# Altium PCB FOC.PcbDoc (part 2 of 2)
Units mil, origin at the board's own origin, x right, y up, seen from the top; angles counter-clockwise.
Board outline 3937.01 x 3149.61 mil, 4 copper layers (Top Layer, GND, signal layer 3, Bottom Layer), stack 23.756 mil thick; 133 components, 165 nets, 424 pads, 310 vias.
Unrouted connection lines stored in the file: 26.
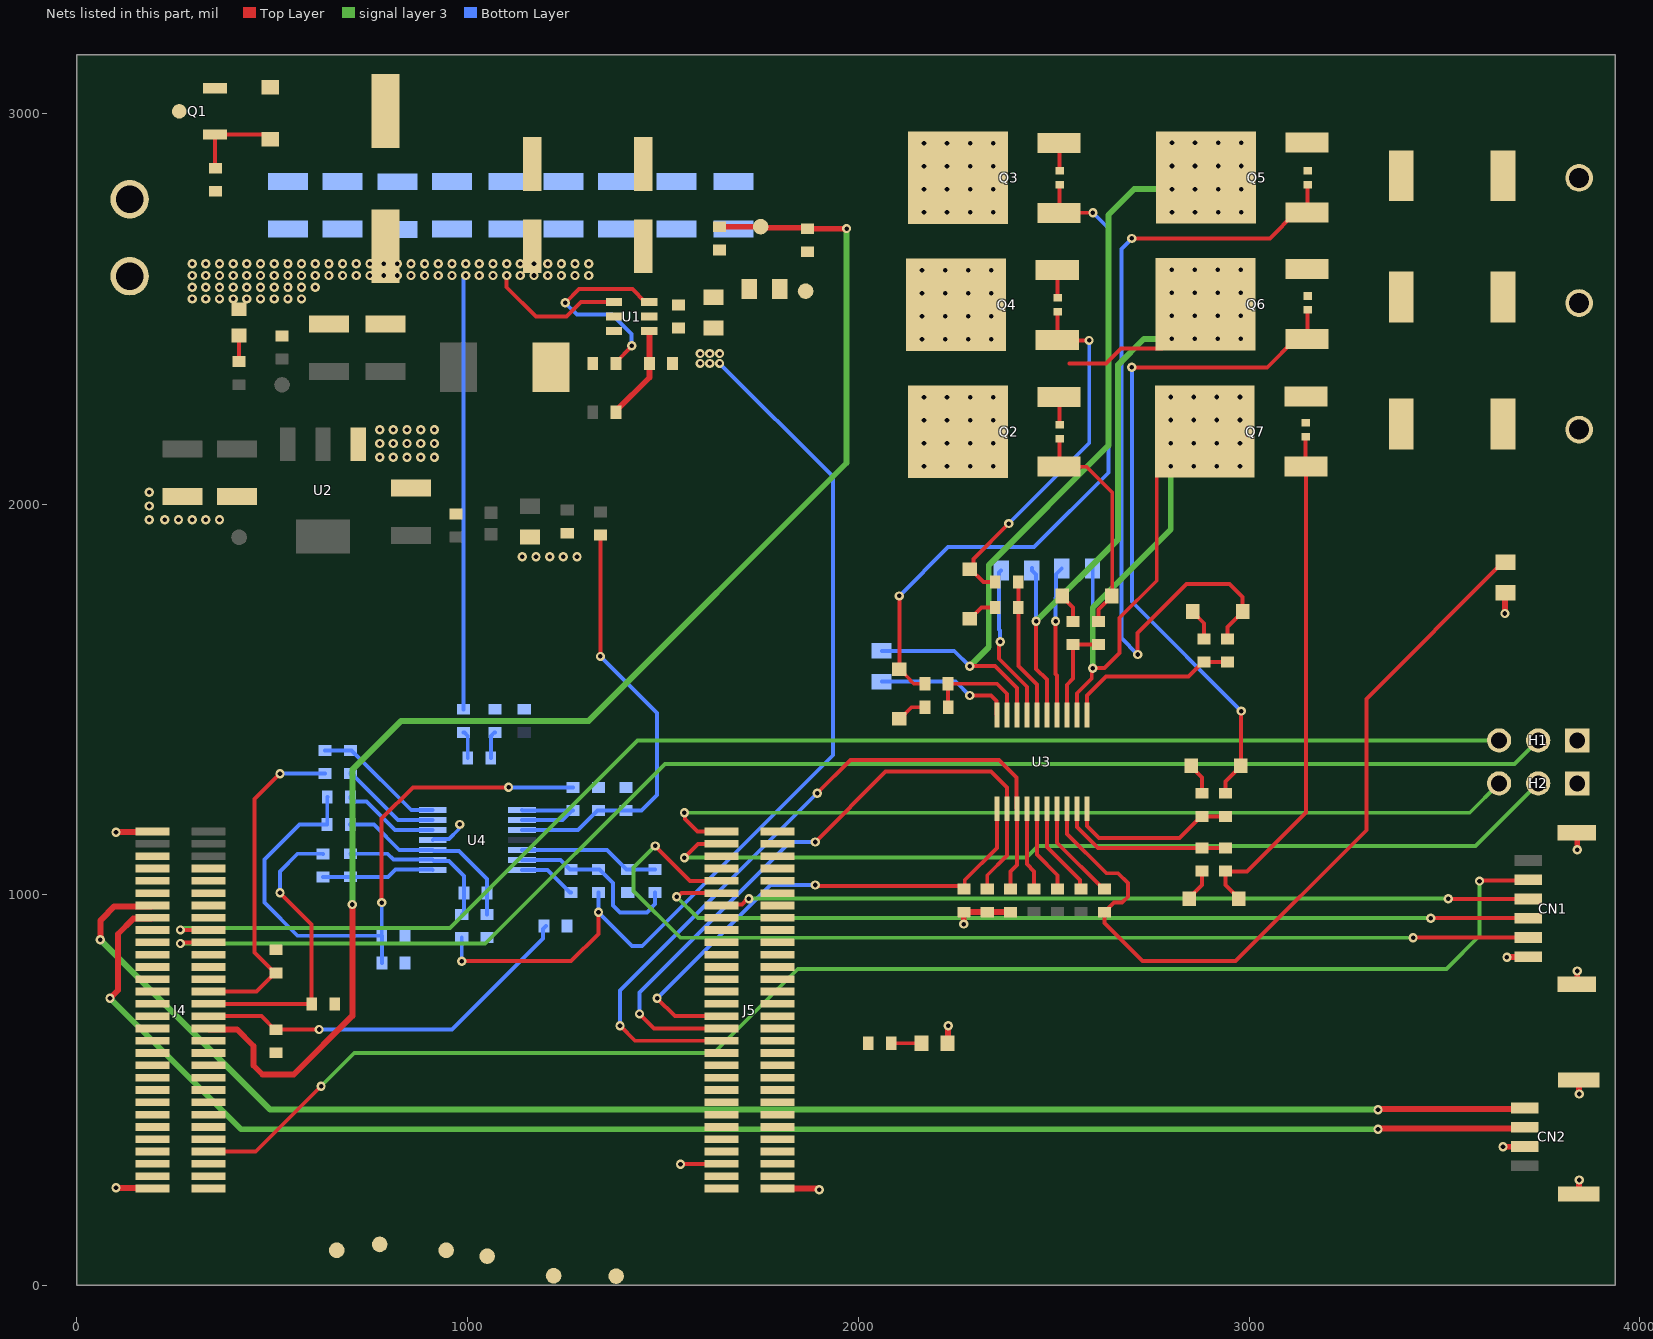
[diagram p4: the nets of this part, all layers, seen from the top]

## Via types
v1: diameter 23.62, hole 11.81, Top Layer to Bottom Layer, 310 vias

## Nets (pads, with @x,y where several pads share a name; then routed paths per layer and width w, separated by ;. In a path a pad name is that pad's centre, name@x,y a point inside that pad or via, vN(x,y) a via of type N, cw(c..) or ccw(c..) an arc to the next point about the centre after c; other vN are vias at no path point) (continued)
+12V: C1.1 C3.1 C4.1 C6.1 C7.1 C8.1 C18.1 C19.1 C20.1 C21.1 C22.1 C23.1 C24.1 C25.1 C26.1 C33.1 D1.1 Q1.3 Q2.2 Q3.2 Q4.2 R1.2 TP1.1 U1.3 U1.5 U3.7 | length 257.6
  Top Layer w10: U3.7@2508.39,1220 2508.39,1133.19 2627.05,1014.53 C33.1@2630,1014.53
  other v1: 2168.06,2096.42 2227.12,2096.42 2227.12,2096.42 2286.17,2096.42 2345.23,2096.42 2168.06,2155.47 2227.12,2155.47 2286.17,2155.47 2345.23,2155.47 2168.06,2214.53 2227.12,2214.53 2286.17,2214.53 2345.23,2214.53 2345.23,2214.53 2168.06,2273.58 2227.12,2273.58 2286.17,2273.58 2345.23,2273.58 2163.06,2421.42 2222.12,2421.42 2222.12,2421.42 2281.17,2421.42 2340.23,2421.42 2163.06,2480.47 2222.12,2480.47 2281.17,2480.47 2340.23,2480.47 2163.06,2539.53 2222.12,2539.53 2281.17,2539.53 2340.23,2539.53 2340.23,2539.53 2163.06,2598.58 2222.12,2598.58 2281.17,2598.58 2340.23,2598.58 2168.06,2746.42 2227.12,2746.42 2227.12,2746.42 2286.17,2746.42 2345.23,2746.42 2168.06,2805.47 2227.12,2805.47 2286.17,2805.47 2345.23,2805.47 2168.06,2864.53 2227.12,2864.53 2286.17,2864.53 2345.23,2864.53 2345.23,2864.53 2168.06,2923.58 2227.12,2923.58 2286.17,2923.58 2345.23,2923.58
GND: C12.2 C13.2 C14.2 C15.2 C16.2 C17.2 C34.2 C35.1 C36.1 C37.2 C38.1 C39.1 CN1.1 CN1.7 CN1.8 CN2.2 CN2.5 CN2.6 H1.1 H2.1 J4.1 J4.30 J5.31 LED2.2 R7.1 R36.2 R37.2 R38.2 R47.1 U2.1 U4.11 | length 899.8
  Top Layer w15: v1(100,250) 100.85,249.15 192.45,249.15 J4.30@193.3,248.3 ; v1(100,1160) 100.85,1160.85 192.45,1160.85 J4.1@193.3,1161.7 ; J5.31@1793.3,248.3 1894.37,248.3 1897.67,245 v1(1900,245) ; LED2.2@2228.47,620 2229.23,620.77 2229.23,664.23 v1(2230,665) ; v1(2270,925) R38.2@2270,955.47 R37.2@2330,955.47 R36.2@2390,955.47 ; v1(3650,355) 3650.2,355.2 3705.9,355.2 CN2.2@3706.1,355.4 ; v1(3655,1720) 3655,1771.61 R7.1@3656.01,1772.62 ; v1(3660,840) 3660.75,840.75 3714.25,840.75 CN1.1@3715,841.5 ; CN1.8@3839,770.7 3840,771.7 v1(3840,805) ; CN1.7@3839,1158.5 3840,1157.5 v1(3840,1115) ; CN2.6@3843.9,234.2 3845,235.3 v1(3845,270) ; CN2.5@3843.9,525.9 3845,524.8 v1(3845,490)
  Bottom Layer w10: U4.11@910.83,1140 913.55,1142.72 952.48,1142.72 977.39,1167.63 977.39,1177.39 v1(980,1180)
  other v1: 1140,1865 1175,1865 1210,1865 1245,1865 1280,1865 185,1960 225,1960 260,1960 295,1960 330,1960 365,1960 185,1995 185,2030 775,2120 810,2120 845,2120 880,2120 915,2120 775,2155 810,2155 845,2155 880,2155 915,2155 775,2190 810,2190 845,2190 880,2190 915,2190
IIC_SCL: CN2.3 J4.8 | length 4040.6
  Top Layer w15: v1(84.65,735.35) 105,755.7 105,899.7 144.15,938.85 190.95,938.85 J4.8@193.3,941.2 ; v1(3330,400) 3331.65,401.65 3703.05,401.65 CN2.3@3706.1,404.7
  signal layer 3 w15: v1(84.65,735.35) 420,400 v1(3330,400)
IIC_SDA: CN2.4 J4.7 | length 4026.8
  Top Layer w15: v1(60,885) 60,933.8 80,953.8 80,955 95.35,970.35 190.95,970.35 J4.7@193.3,972.7 ; v1(3330,450) 3331.65,451.65 3703.85,451.65 CN2.4@3706.1,453.9
  signal layer 3 w15: v1(60,885) 495,450 v1(3330,450)
MCU_ADC_IU: C36.2 J4.45 R45.2 | length 1002.6
  Top Layer w10: J4.45@336.6,689.2 472.37,689.2 507.05,654.53 C36.2@510,654.53 510.24,654.76 619.76,654.76 v1(620,655)
  Bottom Layer w10: v1(620,655) 960,655 1193.27,888.27 1193.27,912.8 R45.2@1200.47,920
MCU_ADC_IV: C38.2 J4.46 R50.2 | length 767
  Top Layer w10: J4.46@336.6,720.7 600.24,720.7 C38.2@600.94,720 600.94,924.06 v1(520,1005)
  Bottom Layer w10: v1(520,1005) 520,1060 565,1105 629.53,1105 R50.2@630,1104.53
MCU_ADC_IW: C39.2 J4.47 R51.2 | length 866.9
  Top Layer w10: J4.47@336.6,752.2 459.25,752.2 C39.2@507.05,800 ; C39.2@510,800 C39.2@507.05,800 ; v1(520,1310) 455,1245 455,852.05 C39.2@507.05,800
  Bottom Layer w10: v1(520,1310) 520.24,1310.24 634.76,1310.24 R51.2@635,1310.47
MCU_PWM_UH: J5.16 R38.1 TP5.1 U3.1 | length 1334
  Top Layer w10: v1(1485,735) 1530.7,689.3 J5.16@1650,689.3 ; v1(1890,1025) 1892.61,1022.39 2262.13,1022.39 R38.1@2270,1014.53 2272.45,1016.98 2272.45,1037.45 2354.84,1119.84 U3.1@2354.84,1220
  Bottom Layer w10: v1(1485,735) 1775,1025 v1(1890,1025)
MCU_PWM_UL: J5.30 R39.2 TP8.1 U3.4 | length 213.1
  Top Layer w10: U3.4@2431.61,1220 2431.61,1078.39 2450,1060 R39.2@2450,1014.53
MCU_PWM_VH: J5.17 R37.1 TP6.1 U3.2 | length 1752.5
  Top Layer w10: v1(1440,695) 1477.2,657.8 J5.17@1650,657.8 ; v1(1890,1135) 2070,1315 2340,1315 2380.43,1274.57 U3.2@2380.43,1220 2380.43,1100.43 2330,1050 R37.1@2330,1014.53
  Bottom Layer w10: v1(1440,695) 1440,750 1825,1135 v1(1890,1135)
MCU_PWM_VL: J5.29 R40.2 TP9.1 U3.5 | length 227.3
  Top Layer w10: U3.5@2457.2,1220 2457.2,1102.8 2510,1050 R40.2@2510,1014.53
MCU_PWM_WH: J5.18 R36.1 TP7.1 U3.3 | length 1936.6
  Top Layer w10: v1(1390,665) 1428.7,626.3 J5.18@1650,626.3 ; v1(1895,1260) 1980,1345 2360,1345 2405.02,1299.98 2405.02,1221 U3.3@2406.02,1220 2406.02,1076.02 2390,1060 R36.1@2390,1014.53
  Bottom Layer w10: v1(1390,665) 1390,755 v1(1895,1260)
MCU_PWM_WL: J5.28 R41.2 TP10.1 U3.6 | length 347.1
  Top Layer w10: v1(1545,310) 1545.65,310.65 1649.35,310.65 J5.28@1650,311.3 ; U3.6@2482.8,1220 2482.8,1122.2 2567.55,1037.45 2567.55,1016.98 R41.2@2570,1014.53
NetC5_1: C5.1 U1.6 | length 538.1
  Top Layer w10: v1(1250,2515) 1285,2550 1421.95,2550 1454.55,2517.4 U1.6@1465.2,2517.4 ; C5.1@1379.53,2360 1379.53,2362.95 1420,2403.43 v1(1420,2405)
  Bottom Layer w10: v1(1250,2515) 1280,2485 1370,2485 1420,2435 v1(1420,2405)
NetC5_2: C5.2 L1.1 U1.2
NetC27_1: C27.1 R33.1 R42.1 U4.6 | length 468.2
  Bottom Layer w10: U4.6@1139.17,1088.82 1237.75,1088.82 1262.05,1064.53 R42.1@1265,1064.53 R33.1@1335,1064.53 1337.95,1064.53 1372.02,1030.47 1372.02,972.99 1390,955 1459.14,955 1480,975.86 C27.1@1480,1005.47
NetC27_2: C27.2 R27.1 R46.2 U4.5 | length 361.5
  Bottom Layer w10: U4.5@1139.17,1114.41 1357.16,1114.41 1407.05,1064.53 R27.1@1410,1064.53 C27.2@1480,1064.53
NetC28_1: C28.1 R34.1 R48.1 U4.9 | length 414.9
  Bottom Layer w10: R48.1@700,1105 795,1105 810,1090 909.65,1090 U4.9@910.83,1088.82 913.55,1086.1 952.48,1086.1 990.47,1048.11 C28.1@990.47,1005 990.47,955 R34.1@985,949.53
NetC28_2: C28.2 R28.1 R52.2 U4.10 | length 498.9
  Bottom Layer w10: R52.2@699.53,1180 760,1180 825,1115 910.24,1115 913.55,1111.69 978.31,1111.69 1030,1060 1049.53,1040.47 C28.2@1049.53,1005 1049.53,950 R28.1@1050,949.53
NetC29_1: C29.1 R29.1 R53.2 U4.12 | length 318.3
  Bottom Layer w10: R53.2@700,1250 700,1247.05 708.78,1238.27 741.73,1238.27 814.41,1165.59 U4.12@910.83,1165.59 ; C29.1@1059.53,1350 1059.53,1406.69 1068.31,1415.47 R29.1@1070,1415.47
NetC29_2: C29.2 R35.1 R49.1 U4.13 | length 331
  Bottom Layer w10: R49.1@700,1310.47 702.95,1310.47 822.25,1191.18 U4.13@910.83,1191.18 ; R35.1@990,1415.47 991.69,1415.47 1000.47,1406.69 C29.2@1000.47,1350
NetC30_1: C30.1 U3.20 | length 350.9
  Top Layer w10: v1(2285,1510) 2340,1510 2353.84,1496.16 2353.84,1461 U3.20@2354.84,1460
  Bottom Layer w10: C30.1@2060,1545.63 2249.37,1545.63 v1(2285,1510)
NetC31_1: C31.1 U3.17 | length 404.5
  Top Layer w10: v1(2363.02,1647.5) 2360.41,1644.89 2360.41,1621.21 2360,1620.79 2360,1604.05 2431.61,1532.44 U3.17@2431.61,1460
  Bottom Layer w10: v1(2363.02,1647.5) 2363.02,1676.29 2360,1679.31 2360,1824.37 C31.1@2365.63,1830
NetC32_1: C32.1 U3.14 | length 382.9
  Top Layer w10: v1(2505,1700) 2505,1565 2508.38,1561.62 U3.14@2508.38,1460
  Bottom Layer w10: v1(2505,1700) 2505,1759.88 2505.94,1760.82 2505.94,1820.31 C32.1@2520.63,1835
NetC37_1: C37.1 R43.1 R47.2 U4.3 | length 1108.4
  Top Layer w10: v1(1340,1610) R43.1@1340,1920.47
  Bottom Layer w10: U4.3@1139.17,1165.59 1282.16,1165.59 1332.05,1215.47 C37.1@1335,1215.47 R47.2@1405,1215.47 1445.47,1215.47 1485,1255 1485,1465 v1(1340,1610)
NetCON1_2: CON1.2 Q1.2
NetD1_2: D1.2 Q1.1 R2.2 | length 233.9
  Top Layer w10: R2.2@355,2859.53 353.4,2861.13 Q1.1@353.4,2945.9 482.4,2945.9 D1.2@495,2933.3
NetD2_1: D2.1 Q2.1 R12.2 R15.2 | length 580
  Top Layer w10: R15.2@2515,2167.28 2515,2096.3 Q2.1@2514.2,2095.5 2584.5,2095.5 2650,2030 2650,1765 2615,1730 R12.2@2615,1699.53
NetD2_2: D2.2 R9.2 | length 77.2
  Top Layer w10: D2.2@2521.6,1765 2521.6,1763.4 2550,1735 R9.2@2550,1699.53
NetD3_1: D3.1 Q3.1 R13.2 R16.2 | length 1775.6
  Top Layer w10: v1(2105,1765) D3.1@2105,1576.8 2106.6,1576.8 2133.04,1550.36 2133.04,1548.76 2141.8,1540 R13.2@2170.47,1540 ; Q3.1@2514.2,2745.5 2515,2746.3 R16.2@2515,2817.28 ; Q3.1@2514.2,2745.5 v1(2600.47,2745.47)
  Bottom Layer w10: v1(2105,1765) 2230,1890 2450,1890 2640,2080 2640,2705.94 v1(2600.47,2745.47)
NetD3_2: D3.2 R10.2 | length 78.4
  Top Layer w10: D3.2@2105,1450 2106.6,1450 2136.6,1480 R10.2@2170.94,1480
NetD4_1: D4.1 Q4.1 R14.2 R17.2 | length 944.5
  Top Layer w10: D4.1@2285,1833.4 2294.84,1843.24 2294.84,1859.84 v1(2385,1950) ; D4.1@2286.6,1833.4 2320,1800 R14.2@2350.47,1800 ; R17.2@2510,2492.28 2510,2421.3 Q4.1@2509.2,2420.5 2510.82,2418.88 v1(2590.69,2418.88)
  Bottom Layer w10: v1(2385,1950) 2591.14,2156.14 2591.14,2418.43 v1(2590.69,2418.88)
NetD4_2: D4.2 R11.2 | length 77.2
  Top Layer w10: D4.2@2285,1706.6 2286.6,1706.6 2315,1735 R11.2@2350.47,1735
NetD5_1: D5.1 Q5.1 R21.2 R25.2 | length 2151.9
  Top Layer w10: v1(2700,2680) 3053.31,2680 3119.47,2746.16 Q5.1@3148.97,2746.16 ; v1(2715,1615) 2715,1670 2840,1795 2950,1795 2983.4,1761.6 D5.1@2983.4,1725 2983.4,1723.4 2945,1685 R21.2@2945,1654.53 ; Q5.1@3150,2747.19 R25.2@3150,2817.28
  Bottom Layer w10: v1(2700,2680) 2673.19,2653.19 2673.19,1656.81 v1(2715,1615)
NetD5_2: D5.2 R18.2 | length 82.2
  Top Layer w10: D5.2@2856.6,1725 2856.6,1723.4 2885,1695 R18.2@2885,1654.53
NetD6_1: D6.1 Q6.1 R22.2 R24.2 | length 1777.1
  Top Layer w10: v1(2700,2350) 3046.7,2350 3118.66,2421.96 Q6.1@3148.16,2421.96 3150,2423.8 R24.2@3150,2497.28 ; R22.2@2940,1259.53 2940,1290 2980,1330 v1(2980,1470)
  Bottom Layer w10: v1(2700,2350) 2700,1750 v1(2980,1470)
NetD6_2: D6.2 R19.2 | length 82.2
  Top Layer w10: D6.2@2851.6,1330 2851.6,1328.4 2880,1300 R19.2@2880,1259.53
NetD7_1: D7.1 Q7.1 R23.2 R26.2 | length 1314.7
  Top Layer w10: D7.1@2973.4,990 2973.4,991.6 2940,1025 R23.2@2940,1060.47 2940.47,1060 2995,1060 3145.91,1210.91 Q7.1@3145.91,2095.96 3145,2096.87 R26.2@3145,2172.28
NetD7_2: D7.2 R20.2 | length 84.3
  Top Layer w10: D7.2@2846.6,990 2846.6,991.6 2880,1025 R20.2@2880,1060.47
NetH1_2: H1.2 J4.51 | length 3763.4
  Top Layer w10: v1@265,875 268.2,878.2 J4.51@336.6,878.2
  signal layer 3 w10: v1(264.85,875.15) 1045.15,875.15 1505,1335 3680,1335 H1.2@3740,1395
NetH1_3: H1.3 J4.52 | length 3647.6
  Top Layer w10: v1(265,910) 265.15,909.85 336.45,909.85 J4.52@336.6,909.7
  signal layer 3 w10: v1(265,910) 270,915 955,915 1435,1395 H1.3@3640,1395
NetH2_2: H2.2 J5.2 | length 2373.3
  Top Layer w10: v1(1555,1095) 1590.2,1130.2 J5.2@1650,1130.2
  signal layer 3 w10: v1(1555,1095) 2430,1095 2460,1125 3580,1125 H2.2@3740,1285
NetH2_3: H2.3 J5.1 | length 2239.9
  Top Layer w10: v1(1555,1210) 1556.46,1208.54 1556.46,1193.54 1588.3,1161.7 J5.1@1650,1161.7
  signal layer 3 w10: v1(1555,1210) 3565,1210 H2.3@3640,1285
NetJ4_3: J4.3
NetJ4_4: J4.4
NetJ4_5: J4.5
NetJ4_6: J4.6
NetJ4_9: J4.9
NetJ4_10: J4.10
NetJ4_11: J4.11
NetJ4_12: J4.12
NetJ4_13: J4.13 R8.2
NetJ4_14: J4.14
NetJ4_15: J4.15
NetJ4_16: J4.16
NetJ4_17: J4.17
NetJ4_18: J4.18
NetJ4_19: J4.19
NetJ4_20: J4.20
NetJ4_21: J4.21
NetJ4_22: J4.22
NetJ4_23: J4.23
NetJ4_24: J4.24
NetJ4_25: J4.25
NetJ4_26: J4.26
NetJ4_27: J4.27
NetJ4_28: J4.28
NetJ4_29: J4.29
NetJ4_31: J4.31
NetJ4_32: J4.32
NetJ4_33: J4.33
NetJ4_35: J4.35
NetJ4_36: J4.36
NetJ4_37: J4.37
NetJ4_38: J4.38
NetJ4_39: J4.39
NetJ4_40: J4.40
NetJ4_41: J4.41
NetJ4_42: J4.42
NetJ4_43: J4.43
NetJ4_44: J4.44 R1.1 R3.2 TP2.1 | length 3656.4
  Top Layer w15: J4.44@336.6,657.8 338.95,655.45 409.55,655.45 452.27,612.73 452.27,562.73 475,540 555,540 705,690 v1(705,975) ; R3.2@1645,2709.53 1645.24,2709.76 1749.76,2709.76 TP2.1@1750,2710 1752.74,2707.26 1867.26,2707.26 R1.1@1870,2704.53 1969.53,2704.53 v1(1970,2705)
  signal layer 3 w15: v1(705,975) 705,1320 830,1445 1310,1445 1970,2105 v1(1970,2705)
NetJ4_48: J4.48
NetJ4_49: J4.49
NetJ4_50: J4.50
NetJ4_53: J4.53
NetJ4_54: J4.54
NetJ4_55: J4.55
NetJ4_56: J4.56
NetJ4_57: J4.57
NetJ5_3: J5.3
NetJ5_4: J5.4
NetJ5_8: J5.8
NetJ5_9: J5.9
NetJ5_10: J5.10
NetJ5_11: J5.11
NetJ5_12: J5.12
NetJ5_13: J5.13
NetJ5_14: J5.14
NetJ5_15: J5.15
NetJ5_19: J5.19
NetJ5_20: J5.20
NetJ5_21: J5.21
NetJ5_22: J5.22
NetJ5_23: J5.23
NetJ5_24: J5.24
NetJ5_25: J5.25
NetJ5_26: J5.26
NetJ5_27: J5.27
NetJ5_32: J5.32
NetJ5_33: J5.33
NetJ5_34: J5.34
NetJ5_35: J5.35
NetJ5_36: J5.36
NetJ5_37: J5.37
NetJ5_38: J5.38
NetJ5_39: J5.39
NetJ5_40: J5.40
NetJ5_41: J5.41
NetJ5_42: J5.42
NetJ5_43: J5.43
NetJ5_44: J5.44
NetJ5_45: J5.45
NetJ5_46: J5.46
NetJ5_47: J5.47
NetJ5_48: J5.48
NetJ5_49: J5.49
NetJ5_50: J5.50
NetJ5_51: J5.51
NetJ5_52: J5.52
NetJ5_53: J5.53
NetJ5_54: J5.54
NetJ5_55: J5.55
NetJ5_56: J5.56
NetJ5_57: J5.57
NetJ5_58: J5.58
NetJ5_59: J5.59
NetJ5_60: J5.60
NetLED1_1: LED1.1 R5.1 | length 67
  Top Layer w10: R5.1@415,2364.53 LED1.1@415,2431.53
NetLED2_1: LED2.1 R8.1 | length 77
  Top Layer w10: R8.1@2084.53,620 LED2.1@2161.53,620
NetQ5_3: Q5.3 R25.1 R27.2 R30.2
NetQ6_3: Q6.3 R24.1 R28.2 R31.2
NetQ7_3: Q7.3 R26.1 R29.2 R32.2
NetR4_1: R4.1 R6.2 U1.4 | length 243.3
  Top Layer w15: R4.1@1379.53,2235 1379.53,2237.95 1465.47,2323.9 R6.2@1465.47,2360 1465.34,2360.14 1465.34,2442.46 U1.4@1465.2,2442.6
NetR42_2: R42.2 R45.1 U4.7 | length 149.8
  Bottom Layer w10: U4.7@1139.17,1063.23 1204.29,1063.23 1262.05,1005.47 R42.2@1265,1005.47
NetR44_1: R44.1 U4.1 U4.2 | length 272.3
  Bottom Layer w10: U4.2@1139.17,1191.18 1242.75,1191.18 1267.05,1215.47 R44.1@1270,1215.47 1269.35,1216.12 1139.82,1216.12 U4.1@1139.17,1216.77
NetR48_2: R48.2 R50.1 U4.8 | length 289.7
  Bottom Layer w10: R50.1@630,1045.47 630.24,1045.71 699.76,1045.71 R48.2@700,1045.94 795.94,1045.94 815,1065 909.06,1065 U4.8@910.83,1063.23
NetR49_2: R49.2 R51.1 U4.14 | length 339.1
  Bottom Layer w10: R51.1@635,1369.53 R49.2@700,1369.53 702.95,1369.53 855.71,1216.77 U4.14@910.83,1216.77
PGND: C1.2 C3.2 C4.2 C6.2 C7.2 C8.2 C9.2 C10.2 C11.2 C18.2 C19.2 C20.2 C21.2 C22.2 C23.2 C24.2 C25.2 C26.2 C33.2 CON1.1 LED1.2 R2.1 R3.1 R6.1 R7.2 R30.1 R31.1 R32.1 R33.2 R34.2 R35.2 U1.1 U3.8 | length 6069.3
  Top Layer w10: v1(985,830) 1265,830 1335,900 v1(1335,955) ; v1(1100,2585) 1100,2555 1175,2480 1252.92,2480 1290.32,2517.4 U1.1@1374.7,2517.4 ; U3.8@2533.98,1220 2533.98,1156.02 2635,1055 2665,1055 2690,1030 2690,995 2675,980 2654.53,980 2641.73,967.2 2641.73,964.25 2632.95,955.47 C33.2@2630,955.47 2630,927.29 2727.29,830 2965,830 3300.21,1165.21 3300.21,1501.47 3650.1,1851.36 R7.2@3656.01,1851.36
  Bottom Layer w10: v1(985,830) R34.2@985,890.47 ; R35.2@990,1474.53 990,2576.31 995,2581.31 v1(995,2585) ; R33.2@1335,1005.47 v1(1335,955) 1420.86,869.14 1447.06,869.14 1935,1357.08 1935,2070 v1(1645,2360)
  other v1: 1595,2360 1620,2360 1595,2385 1620,2385 1645,2385 295,2525 330,2525 365,2525 400,2525 435,2525 470,2525 505,2525 540,2525 575,2525 295,2555 330,2555 365,2555 400,2555 435,2555 470,2555 505,2555 540,2555 575,2555 610,2555 295,2585 330,2585 365,2585 400,2585 435,2585 470,2585 505,2585 540,2585 575,2585 610,2585 645,2585 680,2585 715,2585 750,2585 785,2585 820,2585 855,2585 890,2585 925,2585 960,2585 1030,2585 1065,2585 1135,2585 1170,2585 1205,2585 1240,2585 1275,2585 1310,2585 295,2615 330,2615 365,2615 400,2615 435,2615 470,2615 505,2615 540,2615 575,2615 610,2615 645,2615 680,2615 715,2615 750,2615 785,2615 820,2615 855,2615 890,2615 925,2615 960,2615 995,2615 1030,2615 1065,2615 1100,2615 1135,2615 1170,2615 1205,2615 1240,2615 1275,2615 1310,2615
SPI_CLK: CN1.2 J5.5 | length 2684.8
  Top Layer w10: v1(1480,1125) 1569.3,1035.7 J5.5@1650,1035.7 ; v1(3420,890) 3420.35,890.35 3714.65,890.35 CN1.2@3715,890.7
  signal layer 3 w10: v1(1480,1125) 1425,1070 1425,1010 1545,890 v1(3420,890)
SPI_CS: CN1.5 J4.34 | length 3748.5
  Top Layer w10: J4.34@336.6,342.8 457.8,342.8 v1(625,510) ; v1(3590,1035) 3591.7,1036.7 3713.3,1036.7 CN1.5@3715,1038.4
  signal layer 3 w10: v1(625,510) 710,595 1630,595 1845,810 3505,810 3590,895 v1(3590,1035)
SPI_MISO: CN1.3 J5.6 | length 2321.6
  Top Layer w10: v1(1535,995) 1538.69,995 1547.89,1004.2 J5.6@1650,1004.2 ; v1(3465,940) CN1.3@3715,940
  signal layer 3 w10: v1(1535,995) 1590,940 v1(3465,940)
SPI_MOSI: CN1.4 J5.7 | length 2072.5
  Top Layer w10: J5.7@1650,972.7 1652.87,975.57 1701.89,975.57 1716.31,990 v1(1720,990) ; v1(3510,990) 3510.4,989.6 3714.6,989.6 CN1.4@3715,989.2
  signal layer 3 w10: v1(1720,990) v1(3510,990)
UH: R10.1 R13.1 U3.19 | length 276.2
  Top Layer w10: R10.1@2230,1480 2229.76,1480.24 2229.76,1539.76 R13.1@2229.53,1540 2355,1540 2380.43,1514.57 U3.19@2380.43,1460
UL: R18.1 R21.1 U3.11 | length 445.3
  Top Layer w10: U3.11@2585.15,1460 2585.15,1510.15 2633.76,1558.76 2845.34,1558.76 2882.05,1595.47 R18.1@2885,1595.47 R21.1@2945,1595.47
UO: C30.2 J2.1 Q3.3 Q5.2 R16.1 U3.18 | length 2018.9
  Top Layer w10: v1(2285,1585) 2350,1585 2406.02,1528.98 U3.18@2406.02,1460 ; Q3.3@2514.2,2924.5 2515,2923.7 R16.1@2515,2852.72
  signal layer 3 w15: v1(2285,1585) 2333.71,1633.71 2333.71,1843.71 2640,2150 2640,2740 2706.13,2806.13 v1(2802.84,2806.13)
  Bottom Layer w10: C30.2@2060,1624.37 2245.63,1624.37 v1(2285,1585)
  other v1: 2802.84,2747.08 2861.89,2747.08 2861.89,2747.08 2920.95,2747.08 2980,2747.08 2861.89,2806.13 2920.95,2806.13 2980,2806.13 2802.84,2865.19 2861.89,2865.19 2920.95,2865.19 2980,2865.19 2980,2865.19 2802.84,2924.24 2861.89,2924.24 2920.95,2924.24 2980,2924.24
VH: R11.1 R14.1 U3.16 | length 359.7
  Top Layer w10: R14.1@2409.53,1800 R11.1@2409.53,1735 2409.53,1585.47 2457.2,1537.8 U3.16@2457.2,1460
VL: R19.1 R22.1 U3.10 | length 434.8
  Top Layer w10: U3.10@2585.16,1220 2585.16,1175.7 2615.86,1145 2821.57,1145 2877.05,1200.47 R19.1@2880,1200.47 R22.1@2940,1200.47
VO: C31.2 J3.1 Q4.3 Q6.2 R17.1 U3.15 | length 1660
  Top Layer w10: v1(2455,1700) 2455,1578.28 2482.79,1550.49 U3.15@2482.79,1460 ; Q4.3@2509.2,2599.5 2510,2598.7 R17.1@2510,2527.72 ; 2540,2360 2633.82,2360 2672.19,2398.36 2777.51,2398.36 v1(2802.03,2422.88)
  signal layer 3 w15: v1(2455,1700) 2665,1910 2665,2356.45 2731.43,2422.88 v1(2802.03,2422.88)
  Bottom Layer w10: C31.2@2444.37,1835.91 C31.2@2444.37,1830 2455,1819.37 v1(2455,1700)
  other v1: 2861.08,2422.88 2861.08,2422.88 2920.14,2422.88 2979.19,2422.88 2802.03,2481.93 2861.08,2481.93 2920.14,2481.93 2979.19,2481.93 2802.03,2540.99 2861.08,2540.99 2920.14,2540.99 2979.19,2540.99 2979.19,2540.99 2802.03,2600.05 2861.08,2600.05 2920.14,2600.05 2979.19,2600.05
VREF: C35.2 R44.2 R46.1 R52.1 R53.1 | length 1607.4
  Top Layer w10: v1(780,980) 780,1195 860,1275 v1(1105,1275)
  Bottom Layer w10: R53.1@640.94,1250 640.71,1249.76 640.71,1180.24 R52.1@640.47,1180 570,1180 480,1090 480,980 565,895 R46.1@780.47,895 ; v1(780,980) 780.24,979.76 780.24,895.24 R46.1@780.47,895 ; C35.2@780.94,825 780.71,825.24 780.71,894.76 R46.1@780.47,895 ; v1(1105,1275) 1105.24,1274.76 1269.76,1274.76 R44.2@1270,1274.53
WH: R9.1 R12.1 U3.13 | length 252.1
  Top Layer w10: U3.13@2533.97,1460 2533.97,1537.4 2550,1553.43 R9.1@2550,1640.47 R12.1@2615,1640.47
WL: R20.1 R23.1 U3.9 | length 449.6
  Top Layer w10: U3.9@2559.57,1220 2559.57,1173.01 2613.05,1119.53 R20.1@2880,1119.53 R23.1@2940,1119.53
WO: C32.2 J1.1 Q2.3 Q7.2 R15.1 U3.12 | length 1687.7
  Top Layer w10: Q2.3@2514.2,2274.5 2515,2273.7 R15.1@2515,2202.72 ; U3.12@2559.56,1460 2559.56,1515.69 2597.39,1553.52 2597.39,1577.39 v1(2600,1580) 2630,1580 2669,1619 2669,1709 2763.76,1803.76 2763.76,2072.36 2788.28,2096.88 v1(2799.77,2096.88)
  signal layer 3 w15: v1(2600,1580) 2600,1735 2799.77,1934.77 v1(2799.77,2096.88)
  Bottom Layer w10: C32.2@2599.37,1835 2600,1834.37 v1(2600,1580)
  other v1: 2858.83,2096.88 2858.83,2096.88 2917.88,2096.88 2976.94,2096.88 2799.77,2155.93 2858.83,2155.93 2917.88,2155.93 2976.94,2155.93 2799.77,2214.99 2858.83,2214.99 2917.88,2214.99 2976.94,2214.99 2976.94,2214.99 2799.77,2274.04 2858.83,2274.04 2917.88,2274.04 2976.94,2274.04
pads on no net: J4.2

## Polygon pours and split planes (outlines as drawn)
+5V on Top Layer "+5V_L01_P065" (solid, pour order 65): 380,1085 380,1895 140,1895 140,2240 305,2240 305,2325 40,2325 40,1720 270,1720 270,1085
+3V3 on Top Layer "+3V3_L01_P040" (solid, remove dead copper, pour order 40): 555,1955 925,1955 925,1940 1090,1940 1090,1775 555,1775
GND on Top Layer "GND_L01_P055" (solid, pour order 55): 1120,1945 1300,1945 1300,1845 1120,1845
GND on Top Layer "GND_L01_P053" (solid, pour order 53): 165,2055 470,2055 470,1945 165,1945
GND on Top Layer "GND_L01_P052" (solid, remove dead copper, pour order 52): 695,2210 1000,2210 1000,2000 1000,1955 940,1955 940,1975 905,2010 785,2010 695,2100
PGND on Top Layer "PGND_L01_P047" (solid, remove dead copper, pour order 47): 3615,1820 3700,1820 3700,2965 3615,2965
PGND on Top Layer "PGND_L01_P051" (solid, remove dead copper, pour order 51): 1505,2335 1665,2335 1665,2400 1505,2400
NetQ7_3 on Top Layer "NETQ7_3_L01_P046" (solid, remove dead copper, pour order 46): 3086.94,2310 3431.94,2310 3431.94,2099.8 3341.94,2099.8 3341.94,2195 3086.94,2195
NetQ6_3 on Top Layer "NETQ6_3_L01_P045" (solid, remove dead copper, pour order 45): 3089.19,2635 3434.19,2635 3434.19,2425.8 3344.19,2425.8 3344.19,2520 3089.19,2520
NetQ5_3 on Top Layer "NETQ5_3_L01_P044" (solid, remove dead copper, pour order 44): 3090,2965 3435,2965 3435,2750 3345,2750 3345,2840 3090,2840
+12V on Top Layer "+12V_L01_P041" (solid, pour order 41): 1595,2480 1775,2480 1775,2580 1850,2580 1850,2665 2185,2665 2185,2410 1595,2410
3V3A on Top Layer "3V3A_L01_P043" (solid, pour order 43): 1035,1960 1370,1960 1370,2025 1035,2025
NetC5_2 on Top Layer "NETC5_2_L01_P042" (solid, remove dead copper, pour order 42): 1400,2495 1350,2495 1275,2420 1160,2420 1160,2280 1340,2280 1340,2455 1350,2465 1400,2465
+3V3 on Top Layer "+3V3_L01_P038" (solid, pour order 38): 605,2200 605,2005 555,1955 555,1870 705,1870 705,1960 660,2005 660,2200
+5V on Top Layer "+5V_L01_P037" (solid, remove dead copper, pour order 37): 210,2100 570,2100 575,2105 575,2330 210,2330
+5V on Top Layer "+5V_L01_P035" (solid, remove dead copper, pour order 35): 480,2385 480,2280 1035,2280 1035,2420 920,2420 920,2385 560,2385
+12V on Top Layer "+12V_L01_P036" (solid, remove dead copper, pour order 36): 1660,2480 1500,2480 1500,2495 1432.4,2495 1409.91,2457.16 1350,2457.16 1350,2427.98 1409.91,2427.98 1432.4,2465 1497.4,2465 1497.4,2410 1660,2410
PGND on Top Layer "PGND_L01_P034" (solid, remove dead copper, pour order 34): 55,2640 300,2640 300,2825 405,2825 465,2765 1085,2765 1115,2735 1540,2735 1610,2665 1680,2665 1680,2595 1750,2595 1750,2490 1510,2490 1510,2565 880,2565 880,2410 565,2410 480,2410 480,2465 55,2465
WO on Top Layer "WO_L01_P005" (solid, pour order 5): 2450.4,2329.6 2450.4,2234.6 2735.4,2234.6 2735.4,2044.6 3035.4,2044.6 3035.4,2324.6
VO on Top Layer "VO_L01_P004" (solid, pour order 4): 2445,2655 2445,2560 2730,2560 2730,2370 3030,2370 3030,2650
UO on Top Layer "UO_L01_P003" (solid, pour order 3): 2450,2980 2450,2885 2735,2885 2735,2695 3035,2695 3035,2975
+12V on Top Layer "+12V_L01_P002" (solid, remove dead copper, pour order 2): 285,3030 485,3030 685,2830 1070,2830 1125,2775 2090,2775 2090,2045 2420,2045 2420,2980 1040,2980 905,3115 285,3115
NetCON1_2 on Top Layer "NETCON1_2_L01_P000" (solid, remove dead copper, pour order 0): 54.42,2685 210,2685 210,2950 330,2950 330,3070 60,3070
+3V3 on Bottom Layer "+3V3_L04_P064" (solid, pour order 64): 3415,565 3415,490 1045,490 1045,565
+3V3 on Bottom Layer "+3V3_L04_P063" (solid, pour order 63): 555,1955 705,1955 705,1775 555,1775
UO on Bottom Layer "UO_L04_P062" (solid, pour order 62): 2735,2689.42 3890,2689.42 3890,2975 2735,2975
VO on Bottom Layer "VO_L04_P061" (solid, pour order 61): 2735,2368.86 3890,2368.86 3890,2654.44 2735,2654.44
WO on Bottom Layer "WO_L04_P060" (solid, pour order 60): 2735,2044.98 3890,2044.98 3890,2330.56 2735,2330.56
PGND on Bottom Layer "PGND_L04_P050" (solid, remove dead copper, pour order 50): 1545,2335 1740,2335 1740,2625 1290,2625 1290,2497.92 1544.55,2497.92
+12V on Bottom Layer "+12V_L04_P049" (solid, pour order 49): 440,2980 440,2780 2420,2780 2420,2980
PGND on Bottom Layer "PGND_L04_P048" (solid, pour order 48): 55,2640 445,2640 445,2745 1740,2745 1740,2560 645,2560 580,2495 55,2495
+12V on Bottom Layer "+12V_L04_P022" (solid, pour order 22): 2090,2045 2420,2045 2420,2980 2090,2980
GND on GND "GND_L02_P066" (solid, remove dead copper, pour order 66): 0,0 0,3149.61 3937.01,3149.61 3937.01,0

## Silkscreen, mask and mechanical layers (free items; w line width, h text height)
Mechanical 1:
  the board outline again, w10

## Text inside footprints (layer, text, board x,y; h text height)
CON1: Top Overlay "-" at 150,2436.6 h39.4 r90; Top Overlay "+" at 155,2891.6 h39.4 r90